# Altium PCB MCU2560.PcbDoc (part 1 of 2)
Units mm, origin at the board's own origin, x right, y up, seen from the top; angles counter-clockwise.
Board outline 76.71 x 57.78 mm, 2 copper layers (Top Layer, Bottom Layer); 79 components, 135 nets, 451 pads, 123 vias.
Unrouted connection lines stored in the file: 2.
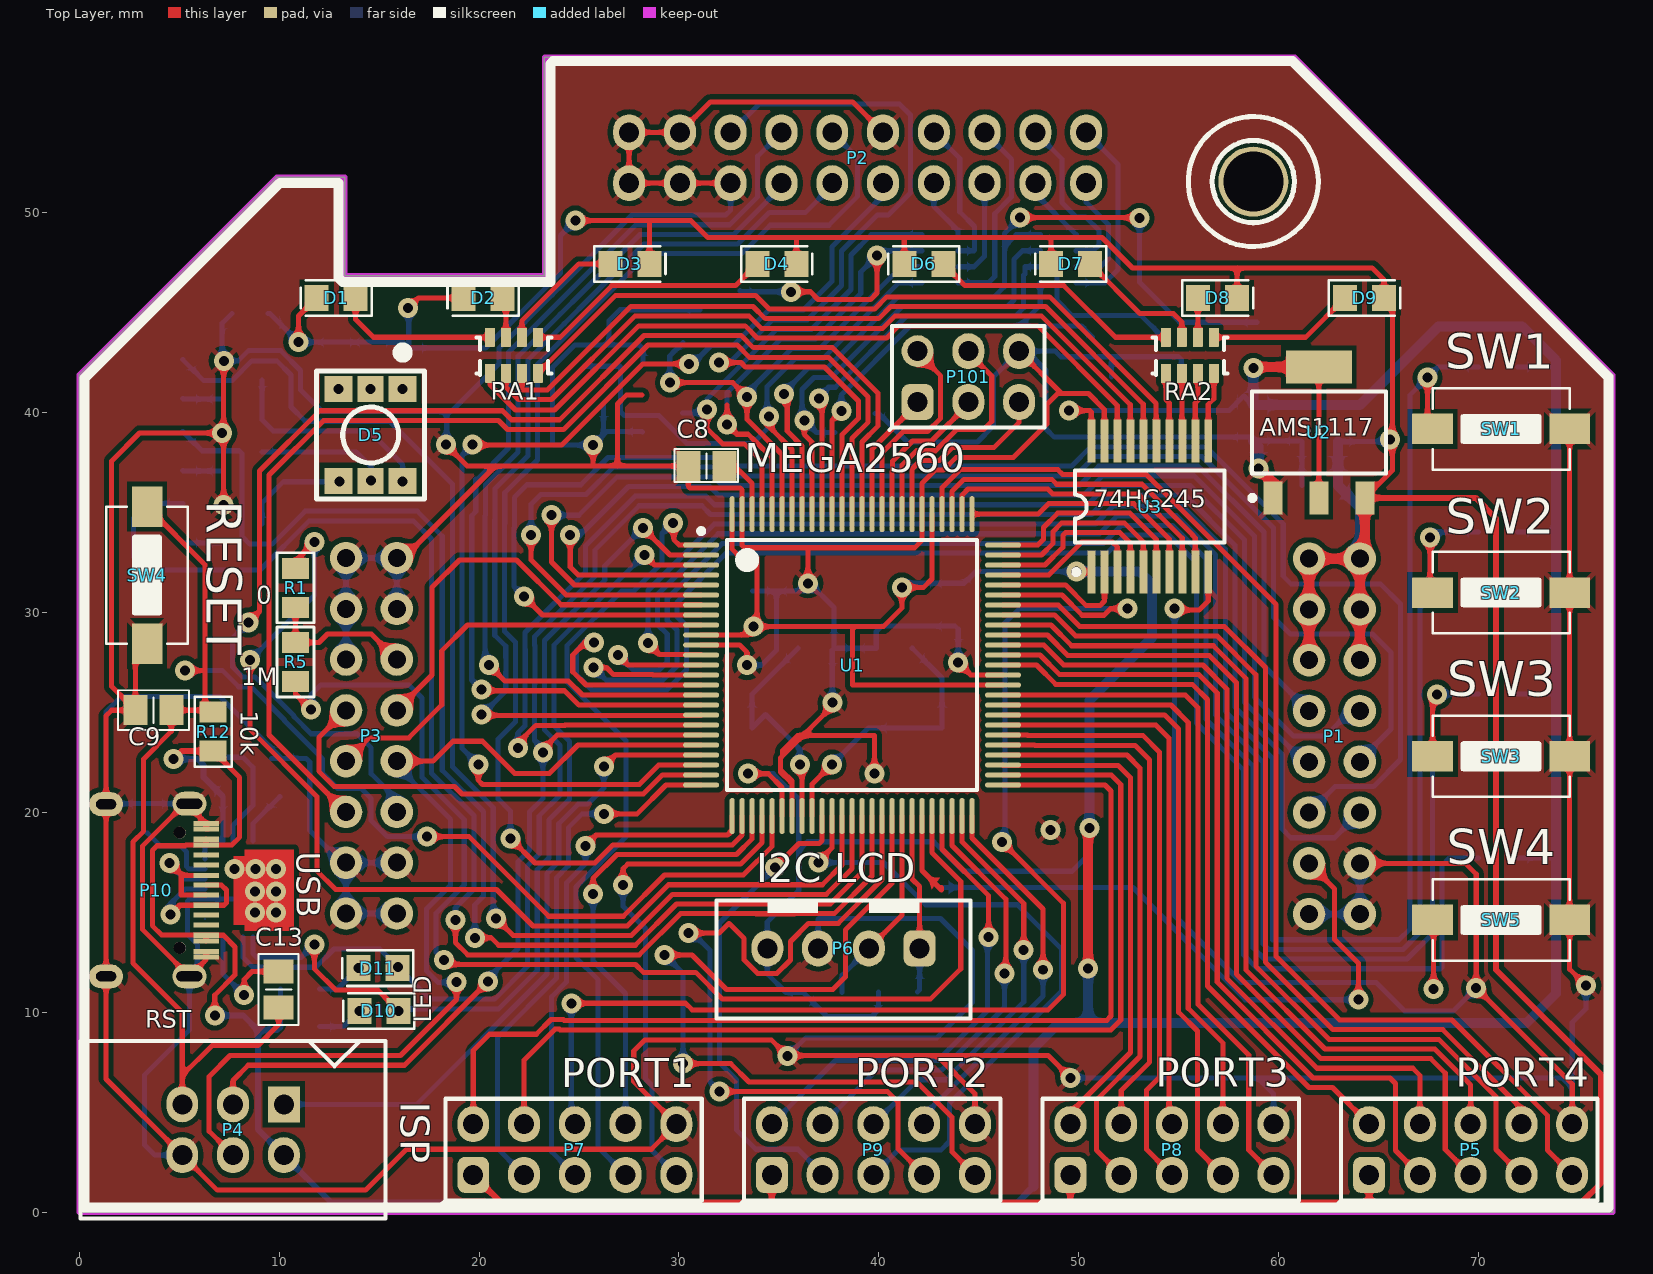
[diagram p0: Top Layer view]
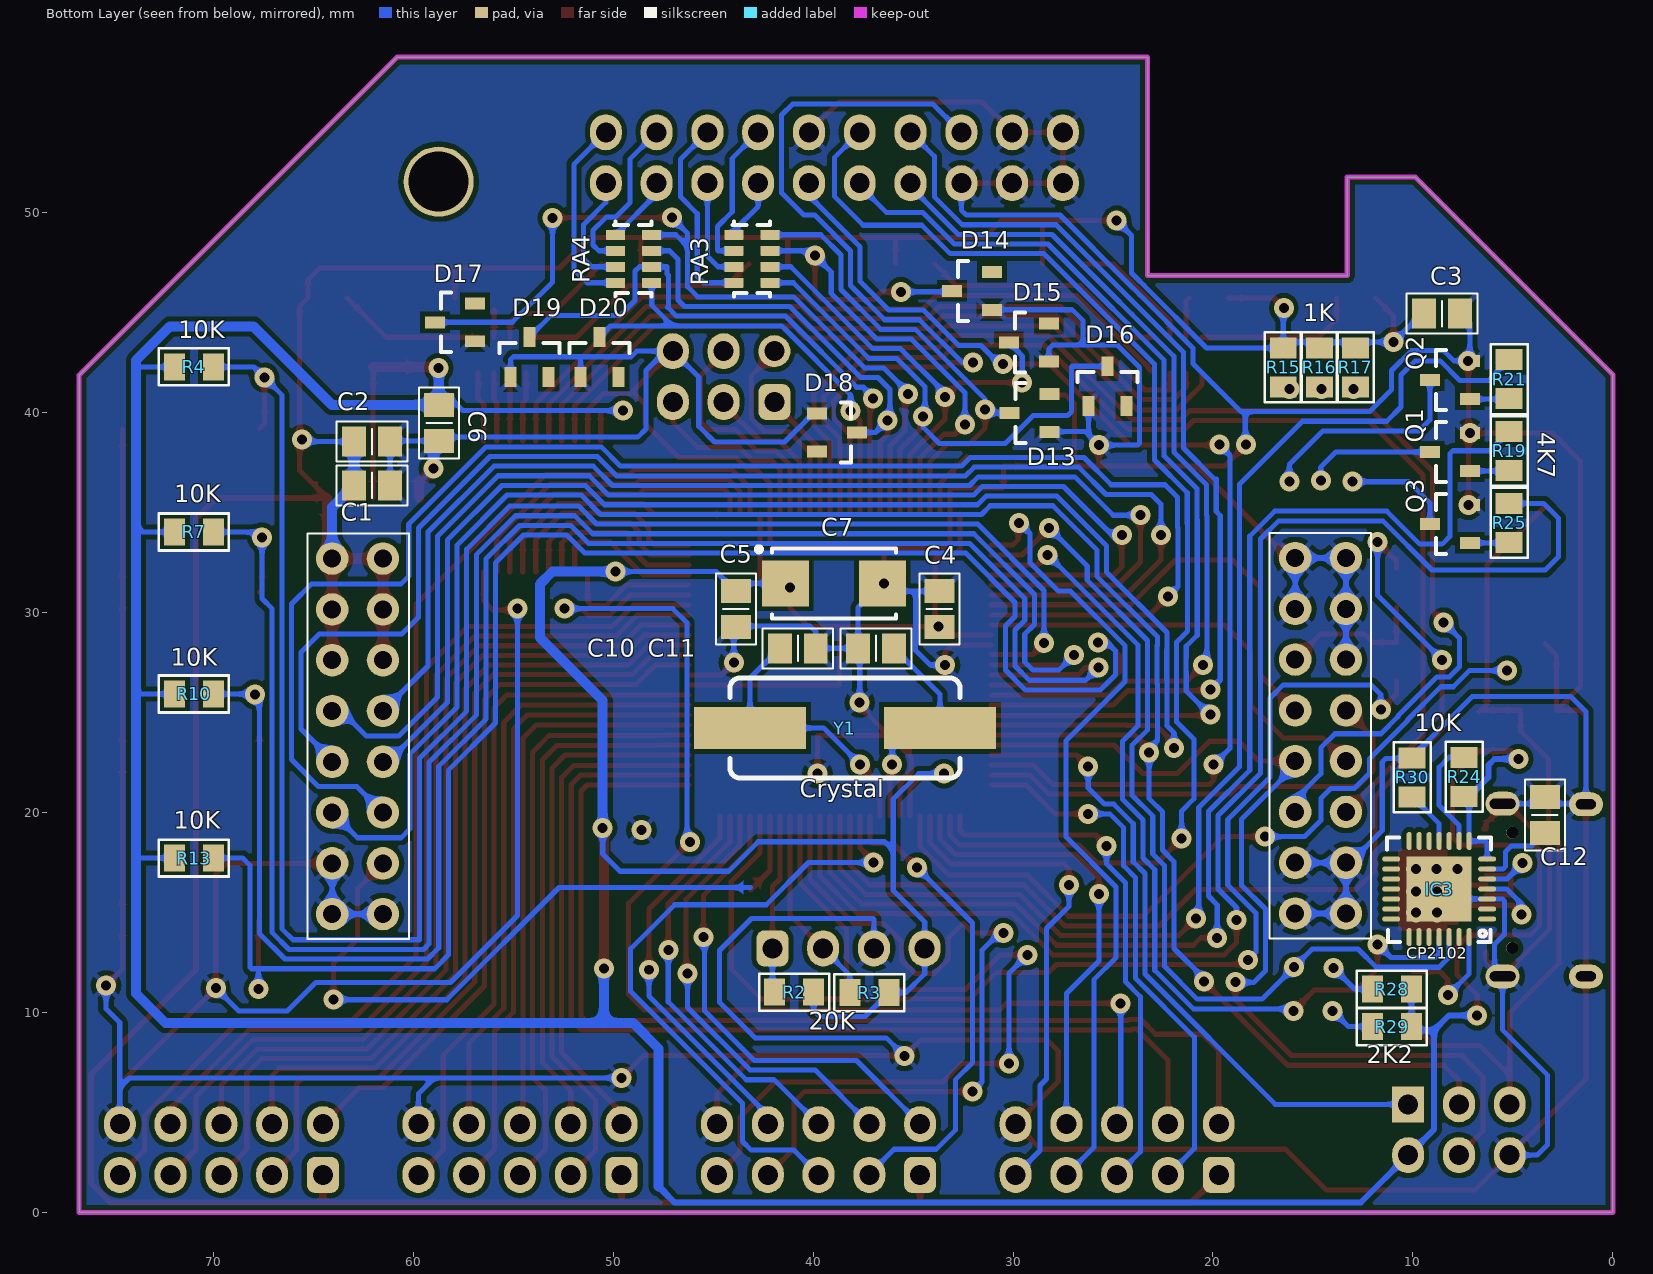
[diagram p1: Bottom Layer view, seen from below]

## Layer stack, top to bottom
Top Solder: solder mask 0.0102, Solder Resist, Dk 3.5
Top Layer: signal copper 0.0356
Dielectric 1: dielectric 0.32, FR-4, Dk 4.8
Bottom Layer: signal copper 0.0356
Bottom Solder: solder mask 0.0102, Solder Resist, Dk 3.5

## Board outline
0,41.885 0,41.91 9.881,51.791 13.284,51.791 13.284,46.863 23.266,46.863 23.266,57.785 60.808,57.785 76.708,41.885 76.708,0 0,0

## Design rules (kind name [scope] priority, off if disabled: settings)
Clearance [All] p1: gap=0.229 ignorepadtopadclearanceinfootprint=FALSE except(0: Arc-Hole Track-Hole SMDPad-Hole THPad-Hole Via-Hole Fill-Hole Poly-Hole Region-Hole Text-Hole; 0.254: Arc-Poly Track-Poly SMDPad-Poly THPad-Poly Via-Poly Fill-Poly Poly-Poly Poly-Region Poly-Text)
PolygonConnect [All] p1: connectstyle=Relief reliefconductorwidth=0.254 reliefentries=4 polygonreliefangle="45 Angle" airgapwidth=0.254
RoutingVias [All] p1: holewidth=0.711 width=1.27 viastyle="Through Hole" minholewidth=0.5 minwidth=1 maxholewidth=0.711 maxwidth=1.27
SolderMaskExpansion [All] p1: expansion=0.102 istentingtop=FALSE
Width [All] p1: maxlimit=10 minlimit=0.254 preferedwidth=0.254
30 further rules are at their usual default settings.

## Components (designator, comment, footprint, x,y, rotation, side; value= is the part's Value field where it differs from the comment)
C1 "104" "C 0805" 62.052,36.373 r180 bottom
C2 "106" "C 0805" 62.052,38.557 r180 bottom
C3 "106" "C 0805" 8.534,44.958 r180 bottom
C4 "106" "C 0805" 33.68,30.175 r90 bottom
C5 "104" "C 0805" 43.866,30.175 r270 bottom
C6 "104" "C 0805" 58.699,39.497 r270 bottom
C7 "100uF" "C SMD TAN 2312 (C)" 38.964,31.471 r180 bottom
C8 "104" "C 0805" 31.369,37.338 r180 top
C9 "104" "C 0805" 3.708,25.121 r180 top
C10 "22" "C 0805" 40.767,28.219 r180 bottom
C11 "22" "C 0805" 36.855,28.219 r0 bottom
C12 "10uF" "C 0805" 3.404,19.888 r270 bottom
C13 "100nF" "C 0805" 9.982,11.151 r90 top
D1 "Led" "Led 0805 RED" 12.852,45.745 r0 top
D2 "Led" "Led 0805 RED" 20.2,45.745 r0 top
D3 "Led" "Led 0805 RED" 27.548,47.447 r180 top
D4 "Led" "Led 0805 RED" 34.896,47.447 r180 top
D5 "LED RGB" "LED RGB 5050" 14.58,38.887 r270 top
D6 "Led" "Led 0805 RED" 42.244,47.447 r0 top
D7 "Led" "Led 0805 RED" 49.592,47.447 r0 top
D8 "Led" "Led 0805 RED" 56.94,45.745 r180 top
D9 "Led" "Led 0805 RED" 64.287,45.745 r180 top
D10 "LED" "Led 0805 RED" 14.986,10.084 r0 top
D11 "LED" "Led 0805 RED" 14.935,12.217 r0 top
D13 "Diode Dual" SOT-23 29.185,39.98 r0 bottom
D14 "Diode Dual" SOT-23 32.055,46.101 r0 bottom
D15 "Diode Dual" SOT-23 29.21,43.51 r0 bottom
D16 "Diode Dual" SOT-23 25.273,41.326 r90 bottom
D17 "Diode Dual" SOT-23 57.912,44.526 r0 bottom
D18 "Diode Dual" SOT-23 38.811,39.014 r180 bottom
D19 "Diode Dual" SOT-23 54.178,42.799 r90 bottom
D20 "Diode Dual" SOT-23 50.673,42.799 r90 bottom
IC3 "CP2102" QFN-P28_N 8.687,16.18 r0 bottom
P1 "Header 8X2" CON2X8N 61.511,32.704 r270 top locked
P2 "Header 10X2" HDR/Header/20/DL 38.936,52.754 r0 top locked
P3 "Header 8X2" CON2X8N 15.886,14.954 r90 top
P4 "Header 3X2" HDR/Header/6/DL/BOX 7.696,4.14 r0 top
P5 "Header 5X2" HDR/Header/10/DL 69.596,3.15 r0 top
P6 "Header 4" HDR/Header/4/BOX 38.227,13.208 r270 top
P7 "Header 5X2" HDR/Header/10/DL 24.79,3.15 r0 top
P8 "Header 5X2" HDR/Header/10/DL 54.661,3.15 r0 top
P9 "Header 5X2" HDR/Header/10/DL 39.726,3.15 r0 top
P10 "USB" "USB Type C 16P" 2.718,16.154 r90 top
P101 "Header 3X2" HDR/Header/6/DL 44.475,41.808 r0 top
Q1 "Transistor NPN" SOT-23 8.153,38.036 r0 bottom
Q2 "Transistor NPN" SOT-23 8.153,41.631 r0 bottom
Q3 "Transistor NPN" SOT-23 8.153,34.442 r0 bottom
R1 "0" "R 0805" 10.82,31.242 r90 top
R2 "20K" "R 0805" 40.945,11.024 r180 bottom
R3 "20k" "R 0805" 37.186,10.998 r180 bottom
R4 "10K" "R 0805" 70.968,42.291 r180 bottom
R5 "1M" "R 0805" 10.82,27.534 r270 top
R7 "10K" "R 0805" 70.968,34.036 r180 bottom
R10 "10K" "R 0805" 70.968,25.933 r180 bottom
R12 "10k" "R 0805" 6.706,24.054 r270 top
R13 "10K" "R 0805" 70.968,17.729 r180 bottom
R15 "1k" "R 0805" 16.485,42.266 r270 bottom
R16 "1k" "R 0805" 14.681,42.266 r270 bottom
R17 "1K" "R 0805" 12.878,42.266 r270 bottom
R19 "4k7" "R 0805" 5.182,38.087 r270 bottom
R21 "4K7" "R 0805" 5.182,41.681 r270 bottom
R24 "10k" "R 0805" 7.442,21.793 r90 bottom
R25 "4k7" "R 0805" 5.182,34.493 r270 bottom
R28 "2K2" "R 0805" 11.049,11.176 r180 bottom
R29 "2k2" "R 0805" 11.049,9.296 r180 bottom
R30 "10K" "R 0805" 10.033,21.768 r270 bottom
RA1 "1k" "RAx4 1206 (3216)" 21.742,42.875 r90 top
RA2 "1k" "RAx4 1206 (3216)" 55.55,42.875 r90 top
RA3 "100" "RAx4 1206 (3216)" 43.053,47.701 r180 bottom
RA4 "100" "RAx4 1206 (3216)" 48.971,47.701 r180 bottom
SW1 "Button" SW/2/SMD 71.12,39.192 r0 top
SW2 "Button" SW/2/SMD 71.12,31.005 r0 top
SW3 "Button" SW/2/SMD 71.12,22.818 r0 top
SW4 "Button" SW/2/SMD 3.395,31.877 r90 top
SW5 "Button" SW/2/SMD 71.12,14.63 r0 top
U1 "ATmega2560-16AU" 100A_N 38.659,27.381 r0 top locked
U2 "AMS1117" SOT-223 62.001,39.014 r90 top
U3 "74HC245" SSOP-20 50.622,32.029 r0 top
Y1 "Crystal" "Crystal HC49US SMD" 38.405,24.232 r180 bottom

## Footprints (in the part's own frame and the unit in brackets; to place one, negate y for a bottom-side part, rotate by r counter-clockwise, add the part's x,y. Pads: shape width x height; smd on the part's side, far side on the other; paste and mask are expansions set on the pad)
100A_N [mm] "Thin QFP, 100-Leads, Body 14x14mm, Pitch 0.5mm, IPC Medium Density"
  oval 1.8x0.254 smd: 1(-7.55,6) 2(-7.55,5.5) 3(-7.55,5) 4(-7.55,4.5) 5(-7.55,4) 6(-7.55,3.5) 7(-7.55,3) 8(-7.55,2.5) 9(-7.55,2) 10(-7.55,1.5) 11(-7.55,1) 12(-7.55,0.5) 13(-7.55,0) 14(-7.55,-0.5) 15(-7.55,-1) 16(-7.55,-1.5) 17(-7.55,-2) 18(-7.55,-2.5) 19(-7.55,-3) 20(-7.55,-3.5) 21(-7.55,-4) 22(-7.55,-4.5) 23(-7.55,-5) 24(-7.55,-5.5) 25(-7.55,-6) 51(7.55,-6) 52(7.55,-5.5) 53(7.55,-5) 54(7.55,-4.5) 55(7.55,-4) 56(7.55,-3.5) 57(7.55,-3) 58(7.55,-2.5) 59(7.55,-2) 60(7.55,-1.5) 61(7.55,-1) 62(7.55,-0.5) 63(7.55,0) 64(7.55,0.5) 65(7.55,1) 66(7.55,1.5) 67(7.55,2) 68(7.55,2.5) 69(7.55,3) 70(7.55,3.5) 71(7.55,4) 72(7.55,4.5) 73(7.55,5) 74(7.55,5.5) 75(7.55,6)
  oval 0.254x1.8 smd: 26(-6,-7.55) 27(-5.5,-7.55) 28(-5,-7.55) 29(-4.5,-7.55) 30(-4,-7.55) 31(-3.5,-7.55) 32(-3,-7.55) 33(-2.5,-7.55) 34(-2,-7.55) 35(-1.5,-7.55) 36(-1,-7.55) 37(-0.5,-7.55) 38(0,-7.55) 39(0.5,-7.55) 40(1,-7.55) 41(1.5,-7.55) 42(2,-7.55) 43(2.5,-7.55) 44(3,-7.55) 45(3.5,-7.55) 46(4,-7.55) 47(4.5,-7.55) 48(5,-7.55) 49(5.5,-7.55) 50(6,-7.55) 76(6,7.55) 77(5.5,7.55) 78(5,7.55) 79(4.5,7.55) 80(4,7.55) 81(3.5,7.55) 82(3,7.55) 83(2.5,7.55) 84(2,7.55) 85(1.5,7.55) 86(1,7.55) 87(0.5,7.55) 88(0,7.55) 89(-0.5,7.55) 90(-1,7.55) 91(-1.5,7.55) 92(-2,7.55) 93(-2.5,7.55) 94(-3,7.55) 95(-3.5,7.55) 96(-4,7.55) 97(-4.5,7.55) 98(-5,7.55) 99(-5.5,7.55) 100(-6,7.55)
  silkscreen extent -7.67,-6.25 6.25,6.82, body extent -8,-8 8,8, height 1
"C 0805" [mm] "Chip Capacitor, 2-Leads, Body 2.0x1.3mm, IPC Medium Density"
  rect 1.2x1.5 smd: 1(-0.9,0) 2(0.9,0)
  silkscreen extent -1.78,-1 1.78,1, body extent -1,-0.64 1,0.61, height 0.6
"C SMD TAN 2312 (C)" [mm] "Molded Capacitor, 2-Leads, Body 6.0x3.2mm, IPC Medium Density"
  rect 2.35x2.3 smd: 1(-2.425,0) 2(2.425,0)
  silkscreen extent -3.88,-1.75 3.1,1.82, body extent -3.09,-1.58 3.09,1.63, height 2.68
CON2X8N [mil]
  round 64 hole 35.43: 1(0,0) 2(0,100) 3(100,0) 4(100,100) 5(200,0) 6(200,100) 7(300,0) 8(300,100) 9(400,0) 10(400,100) 11(500,0) 12(500,100) 13(600,0) 14(600,100) 15(700,0) 16(700,100)
"Crystal HC49US SMD" [mil]
  rect 220.47x82.67 smd: 1(-187,0) 2(187,0)
  silkscreen extent -226,-98 226,98, body extent -250,-93 250,92, height 165
HDR/Header/4/BOX [mm]
  rrect50% 1.8x1.6 hole 1: 1(0,3.81)
  oval 1.8x1.6 hole 1: 2(0,1.27) 3(0,-1.27) 4(0,-3.81)
  silkscreen extent -2.41,-6.35 3.5,6.35, body extent -2.3,-6.25 3.4,6.25, height 7
HDR/Header/6/DL [mm]
  rrect50% 1.6x1.8 hole 1: 1(-2.54,-1.27)
  round 1.6 hole 1: 2(-2.54,1.27)
  oval 1.6x1.8 hole 1: 3(0,-1.27) 4(0,1.27) 5(2.54,-1.27) 6(2.54,1.27)
  silkscreen extent -3.94,-2.67 3.81,2.54
HDR/Header/6/DL/BOX [mm]
  rect 1.6x1.8 hole 1: 1(2.54,1.27)
  oval 1.6x1.8 hole 1: 2(2.54,-1.27) 3(0,1.27) 4(0,-1.27) 5(-2.54,1.27) 6(-2.54,-1.27)
  silkscreen extent -7.62,-4.44 7.62,4.44, body extent -7.62,-4.97 7.62,4.48, height 9.1
HDR/Header/10/DL [mm]
  rrect50% 1.6x1.8 hole 1: 1(-5.08,-1.27)
  oval 1.6x1.8 hole 1: 2(-5.08,1.27) 3(-2.54,-1.27) 4(-2.54,1.27) 5(0,-1.27) 6(0,1.27) 7(2.54,-1.27) 8(2.54,1.27) 9(5.08,-1.27) 10(5.08,1.27)
  silkscreen extent -6.6,-2.67 6.35,2.54, body extent -6.35,-2.54 6.35,2.54, height 8.89
HDR/Header/20/DL [mm]
  oval 1.6x1.8 hole 1: 1(-11.43,-1.27) 2(-11.43,1.27) 3(-8.89,-1.27) 4(-8.89,1.27) 5(-6.35,-1.27) 6(-6.35,1.27) 7(-3.81,-1.27) 8(-3.81,1.27) 9(-1.27,-1.27) 10(-1.27,1.27) 11(1.27,-1.27) 12(1.27,1.27) 13(3.81,-1.27) 14(3.81,1.27) 15(6.35,-1.27) 16(6.35,1.27) 17(8.89,-1.27) 18(8.89,1.27) 19(11.43,-1.27) 20(11.43,1.27)
"Led 0805 RED" [mm] "Led SMD 0805"
  rect 1.2x1.3 smd: 1(-0.975,0) 2(0.975,0)
  silkscreen extent -1.78,-0.89 1.78,0.89, body extent -1.01,-0.63 1.01,0.62, height 1.1
"LED RGB 5050" [mm]
  rect 1.3x1.4 smd: 1(-2.3,1.6) 2(2.3,1.6) 5(-2.3,-1.6) 6(2.3,-1.6)
  rect 1.3x1.3 smd: 3(-2.3,0) 4(2.3,0)
  silkscreen extent -4.25,-2.7 3.2,2.7, body extent -2.65,-2.5 2.65,2.5, height 1.6
QFN-P28_N [mm] "QFN, 28-Leads, Body 6x6 mm, Pitch 0.65mm, IPC Low Density"
  oval 0.9x0.254 smd: 1(-2.4,1.5) 2(-2.4,1) 3(-2.4,0.5) 4(-2.4,0) 5(-2.4,-0.5) 6(-2.4,-1) 7(-2.4,-1.5) 15(2.4,-1.5) 16(2.4,-1) 17(2.4,-0.5) 18(2.4,0) 19(2.4,0.5) 20(2.4,1) 21(2.4,1.5)
  oval 0.254x0.9 smd: 8(-1.5,-2.4) 9(-1,-2.4) 10(-0.5,-2.4) 11(0,-2.4) 12(0.5,-2.4) 13(1,-2.4) 14(1.5,-2.4) 22(1.5,2.4) 23(1.011,2.4) 24(0.509,2.4) 25(0.006,2.4) 26(-0.496,2.4) 27(-0.998,2.4) 28(-1.5,2.4)
  rect 3.25x3.25 smd: 29(0,0)
  Top Layer lines w0.1: 0,-2.4 0.006,-2.4 ; -2.4,1.5 -2.4,1.5
  silkscreen extent -2.6,-2.57 2.6,2.65, body extent -2.4,-2.4 2.4,2.4, height 1
"R 0805" [mm] "Chip Resistor, 2-Leads, Body 2.0x1.3mm, IPC Medium Density"
  rect 1.05x1.35 smd: 1(-0.975,0) 2(0.975,0)
  silkscreen extent -1.75,-0.92 1.75,0.92, body extent -1,-0.61 1,0.59, height 0.5
"RAx4 1206 (3216)" [mm] "Resistor Array x4 1206 (4D03)"
  rrect10% 0.95x0.5 smd: 1(-0.9,1.2) 2(-0.9,0.4) 3(-0.9,-0.4) 4(-0.9,-1.2) 5(0.9,-1.2) 6(0.9,-0.4) 7(0.9,0.4) 8(0.9,1.2)
  silkscreen extent -0.99,-1.88 0.9,1.88, body extent -0.8,-1.6 0.8,1.6, height 0.5
SOT-23 [mm] "SOT23, 3-Leads, Body 3.0x2.5mm (max), Pitch 0.95mm, IPC Medium Density"
  rect 1x0.6 smd: 1(-1,0.95) 2(-1,-0.95) 3(1,0)
  silkscreen extent 0.2,-1.5 0.7,1.5, body extent -1.28,-1.46 1.27,1.46, height 0.95
SOT-223 [mm] "SOT223, 4-Leads, Body 6.7x7.3mm (max), Pitch 2.30mm, IPC Medium Density"
  rect 1.65x0.95 smd: 1(-3.275,2.3) 2(-3.275,0) 3(-3.275,-2.3)
  rect 1.65x3.3 smd: 4(3.275,0)
  silkscreen extent -3.4,-3.35 2.05,3.45, body extent -3.5,-3.25 3.5,3.25, height 1.64
SSOP-20 [mm] "SSOP, Plastic; 20 Leads; Body Width 5.3 mm; Pitch 0.65 mm"
  rect 0.4x2.15 smd: 1(0,0) 2(0.65,0) 3(1.3,0) 4(1.95,0) 5(2.6,0) 6(3.25,0) 7(3.9,0) 8(4.55,0) 9(5.2,0) 10(5.85,0) 11(5.85,6.55) 12(5.2,6.55) 13(4.55,6.55) 14(3.9,6.55) 15(3.25,6.55) 16(2.6,6.55) 17(1.95,6.55) 18(1.3,6.55) 19(0.65,6.55) 20(0,6.55)
  silkscreen extent -0.87,-0.12 6.67,5.07, body extent -0.75,-0.67 6.55,7.22, height 1.79
SW/2/SMD [mil]
  rect 80x60 smd: 1(-135,0) 2(135,0)
  silkscreen extent -135,-80 135,80, body extent -120,-73 120,73, height 98
"USB Type C 16P" [mil]
  rect 10x50 smd: 1(-133,-143) 2(-122,-143) 3(-101,-143) 4(-90,-143) 5(-70,-143) 6(-50,-143) 7(-31,-143) 8(-11,-143) 9(9,-143) 10(28,-143) 11(48,-143) 12(68,-143) 13(88,-143) 14(99,-143) 15(119,-143) 16(130,-143)
  oval 47.24x66.93 hole 19.68 slot 51.18 at 90 deg unplated: 17(-171,-110) 17(169,-110)
  oval 47.24x66.93 hole 19.68 slot 39.37 at 90 deg unplated: 17(-171,54) 17(168,54)
  round 23.62 hole 23.62 unplated: 18(-115,-91) 19(112,-91)
  body extent -190,-147 187,157, height 128

## Part data
C1 C2 C3 C4 C5 C6 C8 C9 C10 C11: library part "Capacitor NP", "Capacitor non-pol"
C7: library part Capacitor, "Capacitor pol"
C12 C13: library part Capacitor, "Capacitor"
D1 D2 D3 D4 D6 D7 D8 D9 D10 D11: "Typical LED"
D13 D14 D15 D16 D17 D18 D19 D20: "Dual Default Diode"
P1 P3: "Header, 8-Pin, Dual row"
P2: "Header, 10-Pin, Dual row"
P4 P101: "Header, 3-Pin, Dual row"
P5 P7 P8 P9: "Header, 5-Pin, Dual row"
P6: "Header, 4-Pin"
P10: library part "USB TYPE C"
Q1 Q2 Q3: "NPN Bipolar Transistor"
R1 R2 R3 R4 R5 R7 R10 R12 R13 R15 R16 R17 R19 R21 R25: library part Resistor, "Resistor"
R24 R28 R29 R30: library part R, "Resistor 1/4W"
RA1 RA2 RA3 RA4: library part "Resistor Array x4"
SW1 SW2 SW3 SW4 SW5: library part "SW SPST", "Tact switch 2 pin"
U1: "8-bit AVR Microcontroller, 4.5-5.5V, 256KB Flash, 4KB EEPROM, 8KB SRAM, 86 GPIO pins, 100-pin TQFP, Industrial Grade (-40°C to 85°C), Pb-Free"
U2: "1A LDO Voltage Regulator, ADJ or fixed 1.5/1.8/2.5/2.85/3.3/5V"
U3: "Octal bus tranceiver, 3-state"

## Free pads (board coordinates)
  round 3.5 hole 3 unplated: 0(58.725,51.562)

## Via types
v1: diameter 1, hole 0.5, Top Layer to Bottom Layer, tented both sides, 123 vias

## Nets (pads, with @x,y where several pads share a name; then routed paths per layer and width w, separated by ;. In a path a pad name is that pad's centre, name@x,y a point inside that pad or via, vN(x,y) a via of type N, cw(c..) or ccw(c..) an arc to the next point about the centre after c; other vN are vias at no path point)
5V: C4.1 C5.1 C6.1 C7.1 IC3.7 IC3.8 P4.2 P6.4 P10.3 P10.4 P10.13 P10.14 R2.2 R3.2 R4.1 R7.1 R10.1 R12.2 R13.1 R24.1 R28.2 R29.2 U1.10 U1.31 U1.61 U1.80 U1.100 U2.2 U2.4 U3.1 U3.20 | length 308.7
  Top Layer w0.254: P10.3@6.35,13.589 P10.4@6.35,13.868 ; P10.14@6.35,18.669 P10.13@6.35,18.39 ; R12.2@6.706,23.079 8.026,21.758 8.026,18.771 7.645,18.39 P10.13@6.35,18.39 ; v1(6.782,9.855) 6.782,10.871 7.798,11.887 7.798,13.284 7.214,13.868 P10.4@6.35,13.868 ; U1.10@31.109,28.881 v1@33.453,28.881 ; U1.100@32.659,34.931 32.659,33.178 33.071,32.766 33.909,32.766 v1@33.909,29.337 ; v1(33.452,21.946) 34.468,21.946 35.159,21.255 U1.31@35.159,19.831 ; v1(33.718,29.299) 38.811,29.299 ; U1.80@42.659,34.931 42.659,31.686 42.24,31.267 v1(41.148,31.267) 41.148,30.226 40.221,29.299 38.811,29.299 ; U1.61@46.209,26.381 38.684,26.381 38.684,29.172 38.811,29.299 ; v1(49.505,40.107) 50.546,40.107 50.622,40.03 U3.20@50.622,38.579 ; v1(49.876,32.054) 49.851,32.029 U3.1@50.622,32.029 ; U2.2@62.001,35.739 U2.4@62.001,42.289 ; P10.4@6.35,13.868 6.35,13.889 4.116,13.889 3.658,14.348 3.658,18.11 3.891,18.344 5.301,18.344 5.347,18.39 P10.13@6.35,18.39
  Top Layer w0.3: v1(4.724,22.682) 5.121,23.079 R12.2@6.706,23.079
  Top Layer w0.5: v1(50.47,12.192) 50.47,19.177 v1(50.521,19.228) ; v1(58.725,42.24) 58.774,42.289 U2.4@62.001,42.289
  Bottom Layer w0.254: IC3.7@6.287,17.68 6.287,18.453 6.413,18.58 IC3.8@7.187,18.58 7.187,20.804 R24.1@7.173,20.818 ; R29.2@10.074,9.296 R28.2@10.074,11.176 ; v1(33.452,21.946) 34.722,21.946 35.992,20.676 35.992,18.11 ; R2.2@39.97,11.024 39.97,10.125 39.649,9.804 37.404,9.804 R3.2@36.211,10.998 35.357,10.998 34.417,11.938 P6.4@34.417,13.208 34.417,14.529 35.992,16.104 35.992,18.11 ; C7.1@41.389,31.471 44.261,31.471 44.845,32.054 v1(49.876,32.054) ; v1(49.505,40.107) 57.517,40.107 58.253,40.843 C6.1@58.699,40.397 ; v1(50.521,19.228) 50.521,17.932 49.657,17.069 44.221,17.069 42.748,18.542 36.424,18.542 35.992,18.11 ; R13.1@71.943,17.729 73.787,17.729 ; R10.1@71.943,25.933 73.66,25.933 73.863,26.137 ; R7.1@71.943,34.036 73.533,34.036 73.863,34.366 ; R4.1@71.943,42.291 73.812,42.291 73.863,42.24
  Bottom Layer w0.3: v1(4.724,22.682) 5.918,22.682 6.223,22.377 6.223,21.768 R24.1@7.173,20.818 ; v1(6.782,9.855) 8.204,9.855 8.941,9.119 ; R29.2@10.074,9.296 9.896,9.119 8.941,9.119 ; 47.727,1.295 46.939,0.508 12.598,0.508 P4.2@10.236,2.87 8.941,4.166 8.941,9.119
  Bottom Layer w0.5: 47.727,1.295 47.727,8.204 48.997,9.474 50.47,9.474 ; v1(49.876,32.054) 53.036,32.054 53.67,31.42 53.67,28.753 50.521,25.603 v1(50.521,19.228) ; v1(50.47,12.192) 50.47,9.474 ; v1(58.725,42.24) 58.725,40.422 C6.1@58.699,40.397 64.07,40.397 67.996,44.323 72.161,44.323 73.863,42.621 73.863,42.24 73.863,34.366 73.863,26.137 73.863,10.947 72.39,9.474 50.47,9.474
7V: C1.1 C2.1 C3.1 D1.1 D2.1 D3.1 D4.1 D6.1 D7.1 D8.1 D9.1 P1.1 P1.2 P1.3 P1.4 P1.5 P1.6 P5.1 P7.1 P8.1 P9.1 R15.1 R16.1 R17.1 U2.3 | length 217.2
  Top Layer w0.254: v1(10.973,43.536) 10.973,44.841 D1.1@11.877,45.745 ; v1(16.459,45.237) 16.967,45.745 D2.1@19.225,45.745 ; v1(24.816,49.606) 28.55,49.606 ; D3.1@28.523,47.447 28.523,49.58 28.55,49.606 ; D4.1@35.871,47.447 35.871,48.736 35.839,48.768 ; D6.1@41.269,47.447 41.269,48.711 41.326,48.768 ; D7.1@48.617,47.447 48.617,48.691 48.539,48.768 ; D8.1@57.915,45.745 57.915,47.244 ; U2.3@64.301,35.739 65.684,37.122 65.684,45.323 D9.1@65.262,45.745 65.262,46.65 64.668,47.244 57.915,47.244 ; 28.55,49.606 30.607,49.606 31.445,48.768 35.839,48.768 ; 35.839,48.768 41.326,48.768 ; 41.326,48.768 48.539,48.768 ; 48.539,48.768 51.156,48.768 52.68,47.244 57.915,47.244
  Top Layer w0.3: P7.1@19.71,1.88 21.084,0.506 34.569,0.506 ; P9.1@34.646,1.88 34.646,0.582 34.569,0.506 ; P8.1@49.581,1.88 49.581,0.582 49.657,0.506 ; U2.3@64.301,35.739 69.848,35.739 70.866,34.722 70.866,12.141 76.124,6.883 76.124,1.473 75.156,0.506 64.516,0.506 ; P5.1@64.516,1.88 64.516,0.506 ; 34.569,0.506 49.657,0.506 ; 49.657,0.506 64.516,0.506
  Top Layer w0.5: P1.5@61.511,27.624 P1.3@61.511,30.164 P1.1@61.511,32.704 P1.2@64.051,32.704 ; P1.6@64.051,27.624 P1.4@64.051,30.164 P1.2@64.051,32.704 ; U2.3@64.301,35.739 64.301,32.954 P1.2@64.051,32.704
  Bottom Layer w0.254: C3.1@9.434,44.958 9.55,44.958 v1(10.973,43.536) 16.19,43.536 R15.1@16.485,43.241 ; v1(16.459,45.237) 16.485,45.212 R15.1@16.485,43.241 ; v1(24.816,49.606) 24.075,48.865 24.075,46.994 23.749,46.669 23.749,46.663 23.466,46.38 23.461,46.38 20.321,43.241 R15.1@16.485,43.241 ; C2.1@62.952,38.557 65.456,38.557 v1(65.557,38.659)
  Bottom Layer w0.5: C2.1@62.952,38.557 C1.1@62.952,36.373 64.051,35.274 P1.2@64.051,32.704
ADC1: D13.3 RA3.8 U1.97 | length 24
  Top Layer w0.254: v1(31.394,40.157) 31.394,39.227 32.178,38.444 33.261,38.444 34.159,37.545 U1.97@34.159,34.931
  Bottom Layer w0.254: D13.3@30.185,39.98 31.217,39.98 v1(31.394,40.157) 31.394,40.678 34.887,44.171 36.616,44.171 38.61,46.164 38.61,47.894 39.617,48.901 RA3.8@42.153,48.901
ADC1_: P2.13 RA3.1 | length 3.1
  Bottom Layer w0.254: P2.13@42.746,51.484 42.746,50.319 43.953,49.113 RA3.1@43.953,48.901
ADC2: D14.3 RA3.7 U1.96 | length 30.6
  Top Layer w0.254: 32.41,40.378 v1(32.41,39.421) 32.905,38.926 33.46,38.926 33.773,38.614 33.776,38.614 34.659,37.731 U1.96@34.659,34.931 ; v1(35.611,46.05) 36.576,46.05 36.957,45.669 39.586,45.669 39.903,45.986 v1(39.903,47.854)
  Bottom Layer w0.254: v1(32.41,39.421) 32.41,41.012 35.087,43.688 36.816,43.688 39.092,45.965 39.092,47.042 v1(39.903,47.854) 40.151,48.101 RA3.7@42.153,48.101 ; D14.3@33.055,46.101 33.106,46.05 v1(35.611,46.05)
ADC2_: P2.14 RA3.2 | length 7.6
  Bottom Layer w0.254: P2.14@42.746,54.024 44.044,52.727 44.044,50.053 44.784,49.313 44.784,48.136 44.748,48.101 RA3.2@43.953,48.101
ADC3: D15.3 RA3.6 U1.95 | length 24.6
  Top Layer w0.254: v1(29.54,41.504) 32.69,41.504 v1(33.401,40.792) 33.401,39.671 35.159,37.914 U1.95@35.159,34.931
  Bottom Layer w0.254: v1(29.54,41.504) 29.54,42.84 D15.3@30.21,43.51 ; v1(33.401,40.792) 33.401,40.983 35.623,43.205 37.016,43.205 41.111,47.301 RA3.6@42.153,47.301
ADC3_: P2.15 RA3.3 | length 5.2
  Bottom Layer w0.254: RA3.3@43.953,47.301 44.761,47.301 45.286,47.826 P2.15@45.286,51.484
ADC4: D16.3 RA3.5 U1.94 | length 29.8
  Top Layer w0.254: v1(34.493,39.802) 34.493,39.326 35.659,38.16 U1.94@35.659,34.931
  Bottom Layer w0.254: D16.3@25.273,42.326 27.042,42.326 27.076,42.291 27.076,40.056 27.28,39.853 29.007,39.853 30.404,38.456 33.68,38.456 34.493,39.268 v1(34.493,39.802) 34.4,39.895 34.4,41.299 35.823,42.723 37.216,42.723 40.994,46.501 RA3.5@42.153,46.501
ADC4_: P2.16 RA3.4 | length 10.1
  Bottom Layer w0.254: RA3.4@43.953,46.501 45.482,46.501 45.793,46.812 45.793,49.958 46.634,50.8 46.634,52.676 P2.16@45.286,54.024
ADC5: D17.3 RA4.8 U1.93 | length 41.4
  Top Layer w0.254: v1(35.255,40.945) 35.416,40.784 35.416,39.086 36.159,38.343 U1.93@36.159,34.931 ; v1(47.066,49.759) 53.01,49.759 v1(53.035,49.733)
  Bottom Layer w0.254: v1(35.255,40.945) 35.255,41.031 36.464,42.24 37.415,42.24 40.971,45.796 45.771,45.796 46.275,46.301 46.275,48.307 ; v1(47.066,49.759) 46.275,48.968 46.275,48.307 ; RA4.8@48.071,48.901 46.869,48.901 46.275,48.307 ; v1(53.035,49.733) 53.035,46.533 55.042,44.526 D17.3@58.912,44.526
ADC5_: P2.17 RA4.1 | length 3.4
  Bottom Layer w0.254: P2.17@47.826,51.484 47.826,50.946 RA4.1@49.871,48.901
ADC6: D18.3 RA4.7 U1.92 | length 24.2
  Top Layer w0.254: v1(36.271,39.624) 36.271,38.913 36.641,38.543 36.641,36.974 36.659,36.957 U1.92@36.659,34.931
  Bottom Layer w0.254: D18.3@37.811,39.014 36.881,39.014 v1(36.271,39.624) 36.152,39.743 36.152,41.161 36.748,41.758 37.615,41.758 41.171,45.314 46.431,45.314 46.758,45.64 46.758,47.672 47.187,48.101 RA4.7@48.071,48.101
ADC6_: P2.18 RA4.2 | length 8.5
  Bottom Layer w0.254: P2.18@47.826,54.024 49.149,52.701 49.149,50.521 49.886,49.784 50.343,49.784 51.003,49.124 51.003,48.387 50.717,48.101 RA4.2@49.871,48.101
ADC7: D19.3 RA4.6 U1.91 | length 29.6
  Top Layer w0.254: v1(37.008,40.716) 37.159,40.867 U1.91@37.159,34.931
  Bottom Layer w0.254: v1(37.008,40.716) 37.008,40.792 37.49,41.275 37.815,41.275 41.257,44.717 41.261,44.717 41.376,44.831 46.728,44.831 46.758,44.832 46.78,44.834 46.799,44.838 46.817,44.843 46.833,44.849 46.849,44.857 46.865,44.866 ; 46.866,44.866 47.275,45.275 47.241,45.309 47.241,46.884 47.301,46.944 47.301,47.301 RA4.6@48.071,47.301 48.685,47.301 48.902,47.085 48.902,45.612 49.657,44.856 53.121,44.856 D19.3@54.178,43.799
ADC7_: P2.19 RA4.3 | length 6
  Bottom Layer w0.254: RA4.3@49.871,47.301 51.086,47.301 51.486,47.701 51.486,49.403 50.366,50.522 P2.19@50.366,51.484
ADC8: D20.3 RA4.5 U1.90 | length 22.9
  Top Layer w0.254: U1.90@37.659,34.931 37.659,39.615 v1(38.125,40.081)
  Bottom Layer w0.254: v1(38.125,40.081) 38.125,40.903 41.457,44.234 41.461,44.234 41.575,44.348 47.041,44.348 ; RA4.5@48.071,46.501 48.071,45.379 47.041,44.348 ; D20.3@50.673,43.799 50.124,44.348 47.041,44.348
ADC8_: P2.20 RA4.4 | length 9.9
  Bottom Layer w0.254: RA4.4@49.871,46.501 51.302,46.501 51.968,47.168 51.968,52.422 P2.20@50.366,54.024
ADC9: P101.1 U1.86 | length 6.5
  Top Layer w0.254: U1.86@39.659,34.931 39.659,38.186 P101.1@41.935,40.462
ADC10: P101.2 U1.85 | length 10.5
  Top Layer w0.254: U1.85@40.159,34.931 40.159,38.003 41.221,39.065 42.431,39.065 43.091,39.725 43.091,41.847 P101.2@41.935,43.002
ADC11: P101.3 U1.84 | length 7.7
  Top Layer w0.254: U1.84@40.659,34.931 40.659,37.059 40.676,37.076 40.676,37.574 41.685,38.583 42.631,38.583 44.475,40.427 P101.3@44.475,40.538
ADC12: P101.4 U1.83 | length 11.8
  Top Layer w0.254: U1.83@41.159,34.931 41.159,37.374 41.885,38.1 42.831,38.1 43.897,39.167 45.237,39.167 45.644,39.573 45.644,41.834 P101.4@44.475,43.002
ADC13: P101.5 U1.82 | length 9.6
  Top Layer w0.254: U1.82@41.659,34.931 41.659,37.192 42.084,37.617 43.03,37.617 43.665,38.252 45.745,38.252 47.015,39.522 P101.5@47.015,40.538
B: D5.6 Q3.3 | length 5.4
  Top Layer w0.254: D5.6@12.993,36.587 v1(13.03,36.551)
  Bottom Layer w0.254: Q3.3@9.153,34.442 9.153,35.493 10.211,36.551 v1(13.03,36.551)
BLUE: R25.1 U1.40 | length 68.5
  Top Layer w0.254: v1(18.821,14.63) 18.821,13.497 19.432,12.886 28.014,12.886 30.075,14.946 33.841,14.946 33.844,14.943 35.777,14.943 35.78,14.946 37.771,14.946 39.659,16.834 U1.40@39.659,19.831
  Bottom Layer w0.254: R25.1@5.182,35.468 3.464,35.468 2.718,34.722 2.718,32.791 3.378,32.131 9.042,32.131 11.506,34.595 16.713,34.595 17.628,33.68 17.628,21.968 19.744,19.851 19.744,16.18 18.821,15.257 v1(18.821,14.63)
BRK1: P1.9 U1.19 | length 69.6
  Top Layer w0.254: v1(21.946,23.241) 21.946,23.47 22.84,24.364 24.29,24.364 24.308,24.381 U1.19@31.109,24.381
  Bottom Layer w0.254: v1(21.946,23.241) 21.946,23.99 22.301,24.346 22.301,26.627 22.311,26.636 22.311,28.145 22.301,28.154 22.301,29.003 25.324,32.026 25.324,33.344 27.812,35.831 31.339,35.831 31.774,35.397 50.427,35.397 51.395,36.365 55.561,36.365 58.293,33.633 58.293,25.507 61.256,22.544 P1.9@61.511,22.544
BRK2: P1.12 P4.3 U1.20 | length 102.8
  Top Layer w0.254: P4.3@7.696,5.41 7.696,6.604 8.458,7.366 16.269,7.366 v1(20.45,11.548) ; v1(23.19,23.012) 23.19,23.165 23.907,23.881 U1.20@31.109,23.881
  Bottom Layer w0.254: v1(20.45,11.548) 20.45,11.713 21.946,13.208 21.946,17.548 22.53,18.132 22.53,20.037 23.19,20.698 v1(23.19,23.012) 23.19,23.206 22.784,23.613 22.784,26.427 22.793,26.437 22.793,28.345 22.784,28.354 22.784,28.804 25.806,31.826 25.806,33.144 28.012,35.349 31.14,35.349 31.574,34.914 50.627,34.914 51.595,35.882 55.304,35.882 57.81,33.376 57.81,25.276 60.173,22.914 60.173,19.177 60.604,18.745 62.793,18.745 P1.12@64.051,20.004
BRK3: P3.7 P4.4 U1.21 | length 50
  Top Layer w0.254: P4.4@7.696,2.87 6.502,4.064 6.502,6.807 7.544,7.849 16.069,7.849 18.875,10.654 v1(18.875,11.524) ; P3.7@15.886,22.574 17.697,22.574 18.694,23.571 20.168,23.571 21.785,21.954 23.517,21.954 24.944,23.381 U1.21@31.109,23.381
  Bottom Layer w0.254: P3.7@15.886,22.574 15.886,22.344 18.567,19.663 18.567,16.368 17.374,15.175 17.374,12.087 17.954,11.506 18.857,11.506 v1(18.875,11.524)
BUT1: R4.2 SW1.1 U1.12 | length 98
  Top Layer w0.254: v1(28.448,28.473) 29.023,27.899 U1.12@31.091,27.899 ; v1(67.437,41.758) 67.437,39.446 SW1.1@67.691,39.192
  Bottom Layer w0.254: v1(28.448,28.473) 28.448,31.115 31.764,34.431 50.827,34.431 51.727,35.331 55.172,35.331 57.328,33.176 57.328,25.076 59.69,22.714 59.69,13.64 66.018,13.64 66.573,14.195 66.573,40.894 v1(67.437,41.758) 67.97,42.291 R4.2@69.993,42.291
BUT2: R7.2 SW2.1 U1.13 | length 95.3
  Top Layer w0.254: v1(26.949,27.889) 27.457,27.381 U1.13@31.109,27.381 ; v1(67.564,33.757) 67.564,31.132 SW2.1@67.691,31.005
  Bottom Layer w0.254: v1(26.949,27.889) 27.711,27.127 29.007,27.127 29.413,27.534 29.413,28.931 28.931,29.413 28.931,30.915 31.964,33.949 51.027,33.949 51.927,34.849 54.889,34.849 56.845,32.893 56.845,24.877 59.207,22.514 59.207,13.44 59.49,13.157 66.218,13.157 67.056,13.995 67.056,30.201 67.564,30.709 v1(67.564,33.757) 67.843,34.036 R7.2@69.993,34.036
BUT3: R10.2 SW3.1 U1.14 | length 90.5
  Top Layer w0.254: v1(25.73,27.254) 26.374,27.254 26.73,26.899 28.685,26.899 28.702,26.881 U1.14@31.109,26.881 ; SW3.1@67.691,22.818 67.691,25.679 v1(67.92,25.908)
  Bottom Layer w0.254: v1(25.73,27.254) 26.365,26.619 29.185,26.619 29.896,27.33 29.896,29.13 29.413,29.613 29.413,30.715 32.164,33.466 51.227,33.466 52.127,34.366 54.69,34.366 56.363,32.693 56.363,24.677 58.725,22.314 58.725,13.24 59.29,12.675 66.418,12.675 67.691,13.948 67.691,25.679 v1(67.92,25.908) 67.945,25.933 R10.2@69.993,25.933
BUT4: R13.2 SW5.1 U1.15 | length 91.3
  Top Layer w0.254: v1(25.756,28.499) 25.298,28.499 24.689,27.889 24.689,27.048 25.355,26.381 U1.15@31.109,26.381 ; SW5.1@67.691,14.63 67.742,14.58 v1(67.742,11.176)
  Bottom Layer w0.254: v1(25.756,28.499) 25.324,28.499 25.298,28.524 24.875,28.1 24.875,26.9 25.638,26.137 29.384,26.137 30.378,27.131 30.378,29.33 29.896,29.813 29.896,30.515 32.364,32.984 51.427,32.984 52.327,33.884 54.49,33.884 55.88,32.493 55.88,24.477 58.242,22.115 58.242,12.878 58.928,12.192 67.818,12.192 ; v1(67.742,11.176) 67.742,12.116 67.818,12.192 ; R13.2@69.993,17.729 68.529,17.729 68.174,17.374 68.174,12.268 68.097,12.192 67.818,12.192
D+: IC3.4 P10.7 P10.9 | length 7.6
  Top Layer w0.254: v1(4.572,14.91) 5.029,15.367 P10.7@6.35,15.367 7.239,15.367 7.366,15.494 7.366,16.129 7.112,16.383 P10.9@6.35,16.383
  Bottom Layer w0.254: v1(4.572,14.91) 4.394,14.91 4.394,15.265 5.309,16.18 IC3.4@6.287,16.18
D-: IC3.5 P10.8 P10.10 | length 6.7
  Top Layer w0.254: v1(4.521,17.475) 5.131,16.866 ; P10.8@6.35,15.875 5.105,15.875 5.105,16.866 5.131,16.866 ; P10.10@6.35,16.866 5.131,16.866
  Bottom Layer w0.254: v1@4.369,17.602 5.291,16.68 IC3.5@6.287,16.68 ; v1@4.496,17.475 v1(4.521,17.475)
DIR1: P1.8 U1.4 | length 60
  Top Layer w0.254: v1(24.562,33.884) 24.562,32.28 24.961,31.881 U1.4@31.109,31.881
  Bottom Layer w0.254: v1(24.562,33.884) 25.044,33.884 27.475,36.314 31.539,36.314 31.974,35.879 50.227,35.879 51.196,36.847 55.761,36.847 58.776,33.833 58.776,25.781 60.731,23.825 62.332,23.825 63.59,25.084 P1.8@64.051,25.084
DIR2: P1.11 U1.8 | length 78.4
  Top Layer w0.254: v1(22.25,30.81) 23.179,29.881 U1.8@31.109,29.881
  Bottom Layer w0.254: v1(22.25,30.81) 21.75,31.31 21.75,34.238 21.768,34.255 21.768,35.763 22.403,36.398 25.089,36.398 26.452,37.762 32.139,37.762 32.574,37.327 49.628,37.327 50.596,38.295 56.361,38.295 60.223,34.432 60.223,31.826 60.604,31.445 65.075,31.445 66.091,30.429 66.091,22.657 64.745,21.311 62.818,21.311 P1.11@61.511,20.004
DIR3: P3.8 U1.9 | length 22.2
  Top Layer w0.254: P3.8@13.346,22.574 14.515,23.742 16.485,23.742 18.136,25.393 18.136,28.092 19.424,29.381 U1.9@31.109,29.381
DTR: C13.2 IC3.28 | length 6
  Top Layer w0.254: v1(8.255,10.871) 8.255,11.659 8.647,12.051 C13.2@9.982,12.051
  Bottom Layer w0.254: IC3.28@7.187,13.78 7.187,11.939 v1(8.255,10.871)
"ENCODER 1": P1.13 U1.45 | length 35.3
  Top Layer w0.254: U1.45@42.159,19.831 42.159,17.099 43.129,16.129 43.129,16.256 ; P1.13@61.511,17.464 62.789,16.187 62.789,13.665 63.983,12.471 v1(63.983,10.643)
  Bottom Layer w0.254: 43.129,16.256 52.705,16.256 58.318,10.643 v1(63.983,10.643)
"ENCODER 2": P3.11 R1.1 R5.1 | length 7.5
  Top Layer w0.254: R1.1@10.82,30.267 R5.1@10.82,28.509 11.999,28.509 12.421,28.931 14.61,28.931 P3.11@15.886,27.654
G: D5.4 Q1.3 | length 6.5
  Top Layer w0.254: D5.4@14.594,36.601 v1(14.605,36.601)
  Bottom Layer w0.254: Q1.3@9.153,38.036 13.856,38.036 14.605,37.287 v1(14.605,36.601)
GATE: P3.5 U1.87 | length 64.4
  Top Layer w0.254: v1(8.458,29.515) 9.017,30.074 9.017,37.081 12.035,40.099 21.17,40.099 21.619,39.649 24.035,39.649 28.251,43.866 33.109,43.866 33.718,43.256 37.674,43.256 39.946,40.984 39.946,39.327 39.159,38.54 U1.87@39.159,34.931
  Bottom Layer w0.254: v1(8.458,29.515) 7.679,28.735 7.679,27.281 8.18,26.78 8.802,26.78 10.752,24.83 10.752,24.792 11.598,23.946 13.9,23.946 14.605,23.241 14.605,21.946 15.886,20.664 P3.5@15.886,20.034